# Altium PCB Thunderscope_Rev5.3.PcbDoc (part 6 of 14)
Units mil, origin at the board's own origin, x right, y up, seen from the top; angles counter-clockwise.
Board outline 3937.01 x 3838.58 mil, 6 copper layers (F.Cu, In1.Cu (GND), In2.Cu (Sign), In3.Cu (Sign), In4.Cu (GND), B.Cu), stack 60.556 mil thick; 911 components, 486 nets, 2834 pads, 2761 vias.
Unrouted connection lines stored in the file: 618.
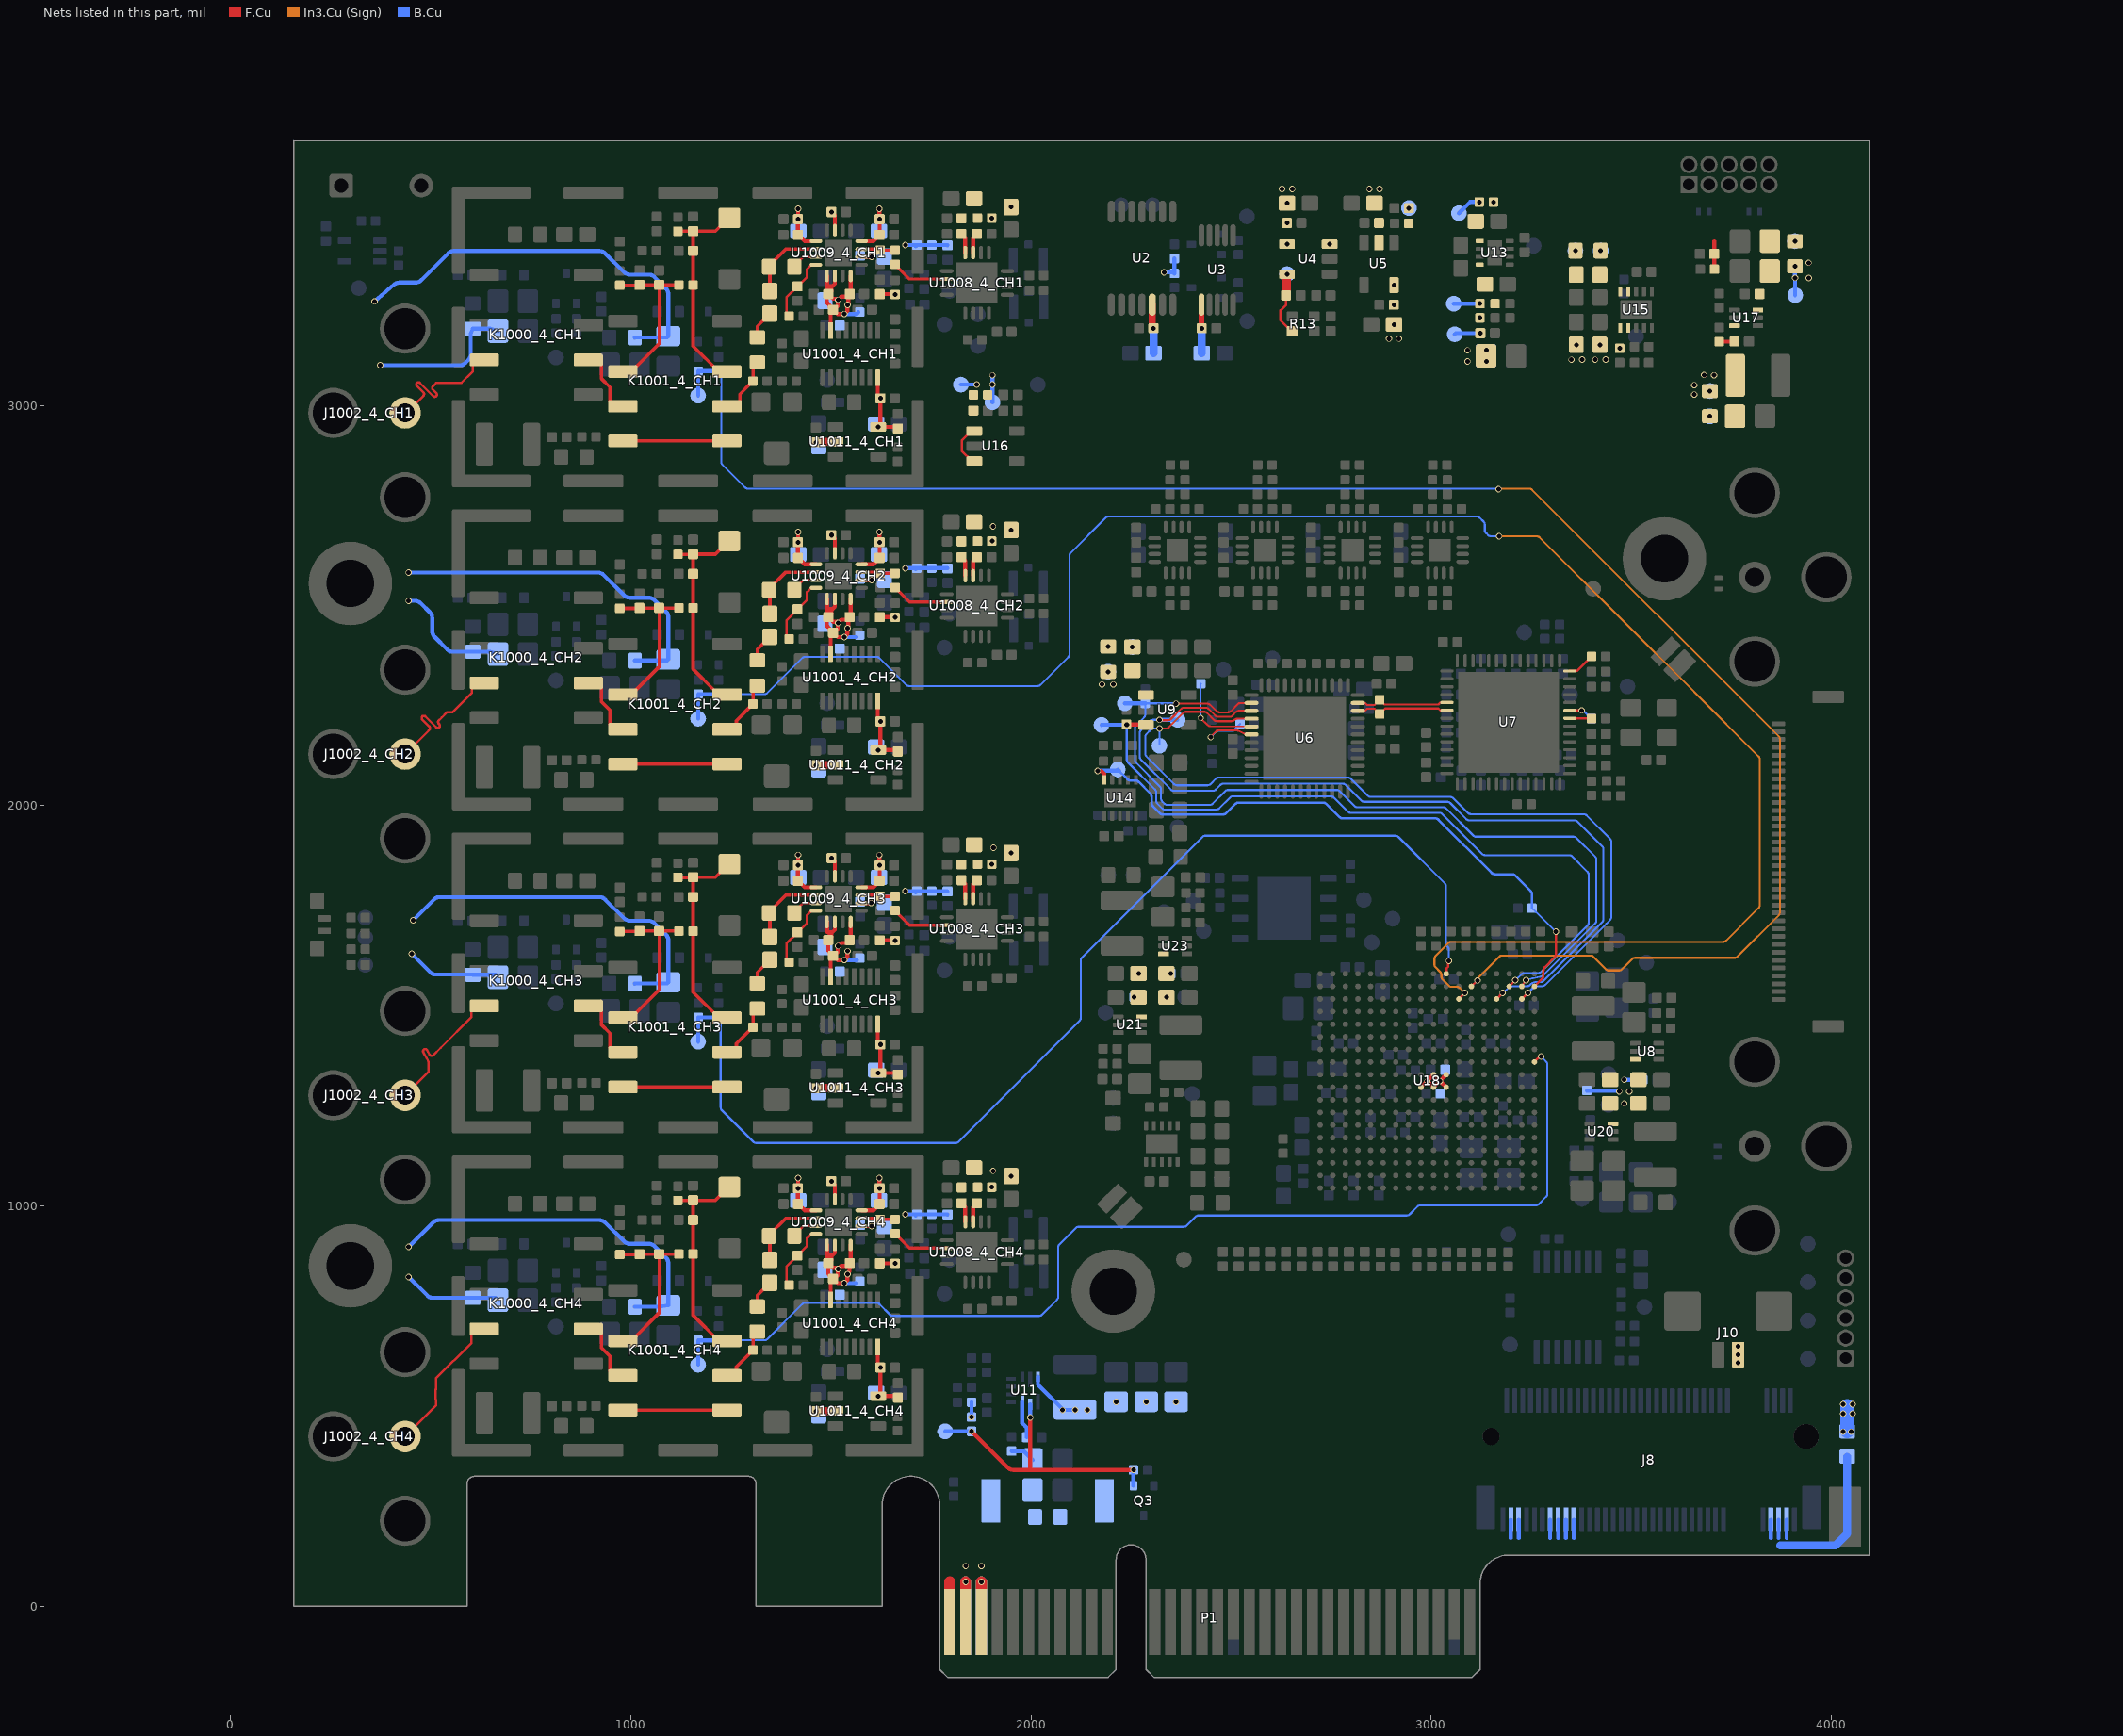
[diagram p9: the nets of this part, all layers, seen from the top]

## Via types
v1: diameter 16, hole 11.81, F.Cu to B.Cu, tented both sides, 2761 vias

## Nets (pads, with @x,y where several pads share a name; then routed paths per layer and width w, separated by ;. In a path a pad name is that pad's centre, name@x,y a point inside that pad or via, vN(x,y) a via of type N, cw(c..) or ccw(c..) an arc to the next point about the centre after c; other vN are vias at no path point) (continued)
+5V: C2.1 C3.1 C5.1 C8.1 C85.2 C94.2 C95.2 C96.2 C121.2 C122.2 C1004_4_CH1.2 C1004_4_CH2.2 C1004_4_CH3.2 C1004_4_CH4.2 C1006_4_CH1.2 C1006_4_CH2.2 C1006_4_CH3.2 C1006_4_CH4.2 C1008_4_CH1.2 C1008_4_CH2.2 C1008_4_CH3.2 C1008_4_CH4.2 C1040_4_CH1.2 C1040_4_CH2.2 C1040_4_CH3.2 C1040_4_CH4.2 C1044_4_CH1.1 C1044_4_CH2.1 C1044_4_CH3.1 C1044_4_CH4.1 C1045_4_CH1.1 C1045_4_CH2.1 C1045_4_CH3.1 C1045_4_CH4.1 C1046_4_CH1.1 C1046_4_CH2.1 C1046_4_CH3.1 C1046_4_CH4.1 C1047_4_CH1.1 C1047_4_CH2.1 C1047_4_CH3.1 C1047_4_CH4.1 C1048_4_CH1.1 C1048_4_CH2.1 C1048_4_CH3.1 C1048_4_CH4.1 C1049_4_CH1.1 C1049_4_CH2.1 C1049_4_CH3.1 C1049_4_CH4.1 C1050_4_CH1.1 C1050_4_CH2.1 C1050_4_CH3.1 C1050_4_CH4.1 FB1000_4_CH1.2 FB1000_4_CH2.2 FB1000_4_CH3.2 FB1000_4_CH4.2 R11.2 R12.2 R100.2 R106.1 TP35.1 TP40.1 U2.12 U3.1 U4.3 U4.4 U5.5 U15.1 U15.2 U1001_4_CH1.16 U1001_4_CH2.16 U1001_4_CH3.16 U1001_4_CH4.16 U1009_4_CH1.1 U1009_4_CH1.12 U1009_4_CH1.15 U1009_4_CH2.1 U1009_4_CH2.12 U1009_4_CH2.15 U1009_4_CH3.1 U1009_4_CH3.12 U1009_4_CH3.15 U1009_4_CH4.1 U1009_4_CH4.12 U1009_4_CH4.15 U1011_4_CH1.5 U1011_4_CH2.5 U1011_4_CH3.5 U1011_4_CH4.5 | length 2209.6
  F.Cu w9.84: v1(1417.72,1044.29) 1418.01,1044.59 1418.01,1069.59 v1(1418.31,1069.88) ; v1(1418.31,1876.97) 1418.31,1853.02 1418.46,1852.87 v1(1418.46,1851.38) ; v1(1418.31,2684.06) 1418.31,2660.11 1418.46,2659.96 v1(1418.46,2658.46) ; v1(1418.31,3491.14) 1418.31,3467.2 1418.46,3467.04 v1(1418.46,3465.55) ; U1009_4_CH4.12@1576.77,989.17 1597.05,989.17 ; U1009_4_CH3.12@1576.77,1796.26 1597.05,1796.26 ; U1009_4_CH2.12@1576.77,2603.35 1597.05,2603.35 ; U1009_4_CH1.12@1576.77,3410.43 1597.05,3410.43 ; C1046_4_CH4.1@1621.06,1045.94 v1(1621.06,1069.88) ; C1046_4_CH3.1@1621.06,1853.03 v1(1621.06,1876.97) ; C1046_4_CH2.1@1621.06,2660.11 v1(1621.06,2684.06) ; C1046_4_CH1.1@1621.06,3467.2 v1(1621.06,3491.14)
  F.Cu w10: C1044_4_CH3.1@1417.01,1851.38 v1(1418.46,1851.38) ; C1044_4_CH2.1@1417.01,2658.46 v1(1418.46,2658.46) ; C1044_4_CH1.1@1417.01,3465.55 v1(1418.46,3465.55) ; v1(1417.72,1044.29) C1047_4_CH4.1@1417.72,1004.92 1418.7,1004.92 1434.45,989.17 U1009_4_CH4.1@1462.6,989.17 ; C1044_4_CH3.1@1417.72,1851.38 C1047_4_CH3.1@1417.72,1812.01 1418.7,1812.01 1434.45,1796.26 U1009_4_CH3.1@1462.6,1796.26 ; C1044_4_CH2.1@1417.72,2658.46 C1047_4_CH2.1@1417.72,2619.09 1418.7,2619.09 1434.45,2603.35 U1009_4_CH2.1@1462.6,2603.35 ; C1044_4_CH1.1@1417.72,3465.55 C1047_4_CH1.1@1417.72,3426.18 1418.7,3426.18 1434.45,3410.43 U1009_4_CH1.1@1462.6,3410.43 ; v1(1501.38,1062.01) 1509.84,1053.54 U1009_4_CH4.15@1509.84,1016.73 ; v1(1501.38,1869.09) 1509.84,1860.63 U1009_4_CH3.15@1509.84,1823.82 ; v1(1501.38,2676.18) 1509.84,2667.72 U1009_4_CH2.15@1509.84,2630.91 ; v1(1501.38,3483.27) 1509.84,3474.8 U1009_4_CH1.15@1509.84,3437.99 ; 1597.05,989.17 1605.91,989.17 C1049_4_CH4.1@1621.65,1004.92 v1(1621.65,1044.29) 1621.65,1043.59 C1046_4_CH4.1@1621.37,1043.31 ; 1597.05,1796.26 1605.91,1796.26 C1049_4_CH3.1@1621.65,1812.01 v1(1621.65,1851.38) 1621.65,1850.67 C1046_4_CH3.1@1621.37,1850.39 ; 1597.05,2603.35 1605.91,2603.35 C1049_4_CH2.1@1621.65,2619.09 v1(1621.65,2658.46) 1621.65,2657.76 C1046_4_CH2.1@1621.37,2657.48 ; 1597.05,3410.43 1605.91,3410.43 C1049_4_CH1.1@1621.65,3426.18 v1(1621.65,3465.55) 1621.65,3464.85 C1046_4_CH1.1@1621.37,3464.57 ; U1001_4_CH4.16@1617.13,647.64 1617.13,602.95 v1(1623.62,596.46) 1623.62,530.61 v1(1618.11,525.1) 1663.48,525.1 C1045_4_CH4.1@1667.32,521.26 ; U1001_4_CH3.16@1617.13,1454.72 1617.13,1410.04 v1(1623.62,1403.54) 1623.62,1337.7 v1(1618.11,1332.19) 1663.48,1332.19 C1045_4_CH3.1@1667.32,1328.35 ; U1001_4_CH2.16@1617.13,2261.81 1617.13,2217.13 v1(1623.62,2210.63) 1623.62,2144.78 v1(1618.11,2139.27) 1663.48,2139.27 C1045_4_CH2.1@1667.32,2135.43 ; U1001_4_CH1.16@1617.13,3068.9 1617.13,3024.21 v1(1623.62,3017.72) 1623.62,2951.87 v1(1618.11,2946.36) 1663.48,2946.36 C1045_4_CH1.1@1667.32,2942.52 ; R106.1@1891.73,3026.57 R106.1@1891.73,3026.77 ; C3.1@2425.98,3193.5 v1(2426.58,3192.91) ; C5.1@2639.37,3456.1 v1(2639.76,3455.71) ; C8.1@2906.59,3251.57 v1(2906.79,3251.38)
  F.Cu w13.78: C3.1@2425.98,3193.5 U3.1@2425.98,3251.97
  F.Cu w17.72: C2.1@2302.95,3198.23 U2.12@2302.95,3251.97
  B.Cu w10: TP40.1@1903.54,3007.8 v1(1903.54,3075.39) ; v1(2332.34,3332.34) 2355.96,3332.34 R12.2@2356.3,3332.68 ; R12.2@2358.27,3329.73 R11.2@2358.27,3367.13
  B.Cu w20: C96.2@2305.91,3130.71 v1(2305.91,3192.91) ; C95.2@2426.57,3130.71 v1(2426.58,3192.91)
  other v1: 1901.58,1046.85 1950,1074.61 1905,1088 1901.58,1853.94 1950,1881.69 1906,1895 1903.58,2661.02 1950,2688.78 1905,2698 1903.54,3052.17 3350.39,3114.17 3376.97,3114.57 3409.45,3114.17 3436.02,3114.57 3470.67,3142.72 3362.4,3151.57 3421.46,3151.57 2894,3166.93 2919.59,3166.93 2906.79,3202.36 2906.79,3300.79 2639.76,3402.95 2746.06,3402.95 1901.58,3468.11 1950,3495.87 2639.76,3505.32 2626.97,3540.75 2652.56,3540.75
+5V3: C100.2 C101.2 C102.1 C128.2 R71.2 R90.1 R98.1 R109.2 TP37.1 TP72.1 U17.6 | length 78.1
  F.Cu w10: R109.2@3703.74,3340.35 3707.48,3344.09 3707.48,3410.43
  B.Cu w10: v1(3908.86,3410.43) 3909.57,3409.72 TP72.1@3915.08,3409.72
  other v1: 3423.42,3386.81 3155.51,3508.27
+5V3_R_CP: C111.2 R90.2 TP28.1 U13.1 | length 62.6
  B.Cu w10: TP28.1@3069.02,3480.43 3096.85,3508.27 v1(3120.08,3508.27)
+5V3_R_LDO: C119.2 C120.2 R98.2 TP34.1 U15.9 U15.10
  other v1: 3360.43,3386.81
+5V_R_PGA: C125.1 R106.2 TP38.1 U16.1 U16.3 | length 148.3
  F.Cu w6: U16.3@1858.27,2861.22 1852.17,2861.22 1826.77,2886.61 1826.77,2912.2 1850.59,2936.02 U16.1@1858.27,2936.02
  B.Cu w10: TP38.1@1824.8,3052.17 v1(1864.17,3052.17)
+12V_PCIe: P1.A2 P1.A3 P1.B1 P1.B2 P1.B3 R42.1 TP14.1 | length 502
  F.Cu w27.56: P1.B1@1797.24,-39.37 1797.24,61.02 ; P1.B2@1836.61,-39.37 v1(1836.61,61.02) ; P1.B3@1875.98,-39.37 v1(1875.98,61.02)
  B.Cu w27.56: P1.A2@1836.61,-39.37 v1(1836.61,61.02) ; P1.A3@1875.98,-39.37 v1(1875.98,61.02)
  other v1: 1836.61,100.39 1875.98,100.39
+12V_PCIe_R: C12.2 C80.2 C81.2 R42.2 R87.2 TP15.1 U11.6 | length 155.6
  B.Cu w10: R87.2@1951.77,387.79 1981.3,387.79 C12.2@2003.94,365.16 ; U11.6@1978.09,511.44 1978.09,457.28 1989.76,445.6 C81.2@1989.76,422.24
+VBIAS: C6.1 C1033_4_CH1.2 C1033_4_CH2.2 C1033_4_CH3.2 C1033_4_CH4.2 R13.2 R1045_4_CH1.1 R1045_4_CH2.1 R1045_4_CH3.1 R1045_4_CH4.1 R1046_4_CH1.1 R1046_4_CH2.1 R1046_4_CH3.1 R1046_4_CH4.1 TP8.1 U4.5 | length 615.9
  F.Cu w6: C6.1@2637.2,3274.8 C6.1@2637.4,3275 2637.4,3251.18 2623.62,3237.4 2623.62,3212.7 2650.69,3185.63 R13.2@2652.36,3185.63
  F.Cu w10: U4.5@2637.4,3325.79 v1(2639.76,3328.15)
  F.Cu w23.62: C6.1@2637.4,3275 U4.5@2637.4,3325.79
  B.Cu w10: v1(1686.02,979.33) R1045_4_CH4.1@1714.57,979.33 ; v1(1686.02,1786.42) R1045_4_CH3.1@1714.57,1786.42 ; v1(1686.02,2593.5) R1045_4_CH2.1@1714.57,2593.5 ; v1(1686.02,3400.59) R1045_4_CH1.1@1714.57,3400.59 ; R1045_4_CH4.1@1711.61,976.38 R1045_4_CH4.1@1714.57,979.33 ; R1045_4_CH3.1@1711.61,1783.46 R1045_4_CH3.1@1714.57,1786.42 ; R1045_4_CH2.1@1711.61,2590.55 R1045_4_CH2.1@1714.57,2593.5 ; R1045_4_CH1.1@1711.61,3397.64 R1045_4_CH1.1@1714.57,3400.59 ; C1033_4_CH4.2@1791.34,978.74 1790.75,979.33 R1046_4_CH4.1@1751.97,979.33 R1045_4_CH4.1@1714.57,979.33 ; C1033_4_CH3.2@1791.34,1785.83 1790.75,1786.42 R1046_4_CH3.1@1751.97,1786.42 R1045_4_CH3.1@1714.57,1786.42 ; C1033_4_CH2.2@1791.34,2592.91 1790.75,2593.5 R1046_4_CH2.1@1751.97,2593.5 R1045_4_CH2.1@1714.57,2593.5 ; C1033_4_CH1.2@1791.34,3400 1790.75,3400.59 R1046_4_CH1.1@1751.97,3400.59 R1045_4_CH1.1@1714.57,3400.59 ; TP8.1@2637.4,3314.57 2637.4,3325.79 v1(2639.76,3328.15)
+VPGA_CH1: C1036_4_CH1.1 C1037_4_CH1.1 C1038_4_CH1.1 C1039_4_CH1.2 FB1000_4_CH1.1 U1008_4_CH1.3 U1008_4_CH1.4 | length 102.3
  F.Cu w9.84: C1038_4_CH1.1@1826.18,3467.52 C1038_4_CH1.1@1826.97,3468.31 ; FB1000_4_CH1.1@1865.55,3467.52 FB1000_4_CH1.1@1866.14,3468.11
  F.Cu w10: C1036_4_CH1.1@1826.18,3428.15 1835.55,3418.78 1835.55,3381.97 U1008_4_CH1.4@1835.63,3381.89 ; U1008_4_CH1.3@1855.31,3381.89 1855.39,3381.97 1855.39,3418.78 C1037_4_CH1.1@1864.76,3428.15
+VPGA_CH2: C1036_4_CH2.1 C1037_4_CH2.1 C1038_4_CH2.1 C1039_4_CH2.2 FB1000_4_CH2.1 U1008_4_CH2.3 U1008_4_CH2.4 | length 102.3
  F.Cu w9.84: C1038_4_CH2.1@1826.18,2660.43 C1038_4_CH2.1@1826.97,2661.22 ; FB1000_4_CH2.1@1865.55,2660.43 FB1000_4_CH2.1@1866.14,2661.02
  F.Cu w10: C1036_4_CH2.1@1826.18,2621.06 1835.55,2611.69 1835.55,2574.88 U1008_4_CH2.4@1835.63,2574.8 ; U1008_4_CH2.3@1855.31,2574.8 1855.39,2574.88 1855.39,2611.69 C1037_4_CH2.1@1864.76,2621.06
+VPGA_CH3: C1036_4_CH3.1 C1037_4_CH3.1 C1038_4_CH3.1 C1039_4_CH3.2 FB1000_4_CH3.1 U1008_4_CH3.3 U1008_4_CH3.4 | length 102.3
  F.Cu w9.84: C1038_4_CH3.1@1826.18,1853.35 C1038_4_CH3.1@1826.97,1854.13 ; FB1000_4_CH3.1@1865.55,1853.35 FB1000_4_CH3.1@1866.14,1853.94
  F.Cu w10: C1036_4_CH3.1@1826.18,1813.98 1835.55,1804.61 1835.55,1767.8 U1008_4_CH3.4@1835.63,1767.72 ; U1008_4_CH3.3@1855.31,1767.72 1855.39,1767.8 1855.39,1804.61 C1037_4_CH3.1@1864.76,1813.98
+VPGA_CH4: C1036_4_CH4.1 C1037_4_CH4.1 C1038_4_CH4.1 C1039_4_CH4.2 FB1000_4_CH4.1 U1008_4_CH4.3 U1008_4_CH4.4 | length 102.3
  F.Cu w9.84: C1038_4_CH4.1@1826.18,1046.26 C1038_4_CH4.1@1826.97,1047.05 ; FB1000_4_CH4.1@1865.55,1046.26 FB1000_4_CH4.1@1866.14,1046.85
  F.Cu w10: C1036_4_CH4.1@1826.18,1006.89 1835.55,997.52 1835.55,960.71 U1008_4_CH4.4@1835.63,960.63 ; U1008_4_CH4.3@1855.31,960.63 1855.39,960.71 1855.39,997.52 C1037_4_CH4.1@1864.76,1006.89
+VUSB: C9.2 C10.2 C22.2 C71.2 C72.2 C73.2 C83.2 C84.2 C175.2 C179.2 C187.2 C1026_4_CH1.2 C1026_4_CH2.2 C1026_4_CH3.2 C1026_4_CH4.2 C1028_4_CH1.2 C1028_4_CH2.2 C1028_4_CH3.2 C1028_4_CH4.2 J10.1 L6.2 R1.2 R14.1 R54.2 R71.1 R73.2 R89.1 R92.1 R117.2 R121.2 R128.2 R1027_4_CH1.1 R1027_4_CH2.1 R1027_4_CH3.1 R1027_4_CH4.1 R1028_4_CH1.1 R1028_4_CH2.1 R1028_4_CH3.1 R1028_4_CH4.1 TP21.1 TP30.1 TP71.1 U8.3 U11.3 U20.3 U21.3 U23.3 | length 5291.7
  B.Cu w10: v1(360,3260) 408.52,3302.15 cw(c421.63,3287.05) 421.63,3307.05 462.15,3307.05 ccw(c462.15,3327.05) 476.26,3312.88 543.39,3380 cw(c557.5,3365.83) 557.5,3385.83 921.52,3385.83 cw(c921.52,3365.83) 935.61,3380.02 983.4,3332.55 ccw(c997.46,3346.77) 997.46,3326.77 1044.87,3326.77 cw(c1044.87,3306.77) 1058.99,3320.93 1087.86,3292.06 cw(c1073.7,3277.94) 1093.7,3277.94 1093.7,3192.42 C1028_4_CH1.2@1093.7,3173.23 1090.69,3170.22 1009.98,3170.22 R1028_4_CH1.1@1009.45,3169.69 ; v1(374.02,3100.39) 572.42,3100.39 ccw(c572.42,3120.39) 586.53,3106.22 594.17,3113.86 ccw(c580,3127.97) 600,3127.97 600,3179.02 R1027_4_CH1.1@605.12,3191.73 648.92,3191.73 C1026_4_CH1.2@668.11,3185.83 ; v1(444.88,822.83) 491.39,776.33 491.42,776.29 ccw(c505.53,790.47) 505.53,770.47 R1027_4_CH4.1@605.12,770.47 C1026_4_CH4.2@662.2,770.47 ; v1(444.88,897.64) 506.31,959.07 cw(c520.46,944.93) 520.46,964.93 921.15,964.93 cw(c921.15,944.93) 935.25,959.12 983.42,911.26 ccw(c997.46,925.51) 997.46,905.51 1044.87,905.51 cw(c1044.87,885.51) 1059.01,899.65 1087.84,870.82 cw(c1073.7,856.68) 1093.7,856.68 1093.7,771.16 C1028_4_CH4.2@1093.7,751.97 1070.57,748.43 R1028_4_CH4.1@1009.45,748.43 ; v1(444.88,2511.81) 461.04,2511.81 cw(c461.04,2491.81) 475.15,2505.98 497.96,2483.17 cw(c483.82,2469.03) 503.82,2469.03 503.82,2435.93 ccw(c523.82,2436.02) 509.62,2421.93 541.07,2390.48 ccw(c555.19,2404.65) 555.19,2384.65 648.92,2384.65 C1026_4_CH2.2@668.11,2378.74 ; v1(444.88,2582.68) 917.9,2582.68 cw(c917.9,2562.68) 932.03,2576.83 ; v1(452.76,1629.92) 498.74,1583.94 ccw(c512.81,1598.15) 512.81,1578.15 590.43,1578.15 R1027_4_CH3.1@605.12,1577.56 C1026_4_CH3.2@662.2,1577.56 ; v1(456.26,1713.73) 508.26,1765.74 cw(c522.41,1751.6) 522.41,1771.6 921.57,1771.6 cw(c921.57,1751.6) 935.67,1765.79 983.4,1718.38 ccw(c997.46,1732.6) 997.46,1712.6 1044.87,1712.6 cw(c1044.87,1692.6) 1058.99,1706.76 1087.86,1677.88 cw(c1073.7,1663.76) 1093.7,1663.76 1093.7,1578.25 C1028_4_CH3.2@1093.7,1559.06 1090.69,1556.04 1009.98,1556.04 R1028_4_CH3.1@1009.45,1555.51 ; 932.04,2576.82 983.38,2525.48 ccw(c997.46,2539.68) 997.46,2519.68 1044.87,2519.68 cw(c1044.87,2499.68) 1058.98,2513.86 1087.88,2484.96 cw(c1073.7,2470.85) 1093.7,2470.85 1093.7,2385.33 C1028_4_CH2.2@1093.7,2366.14 1090.69,2363.13 1009.98,2363.13 R1028_4_CH2.1@1009.45,2362.6 ; v1(1851.38,472.44) R73.2@1851.38,509.84 ; U11.3@2017.45,573.46 2017.53,573.38 2017.53,553.64 2080.67,490.5 v1(2110,490.5) ; R117.2@3388.78,1288.39 3466.98,1288.39 v1(3469.49,1285.88) ; v1(3482.28,1315.4) R1.2@3527.76,1315.4 ; v1(3908.86,3347.44) v1(3908.86,3318.83) 3909.15,3318.54 3909.15,3275.89 TP71.1@3909.45,3275.59
  B.Cu w35: R54.2@4039.37,437.01 4039.37,500.63
  other v1: 4029,436 4049,436 4029,481 4053,481 2079,490 2141,490 4029,505 4053,505 2212.77,510.83 2287.57,510.83 2362.38,510.83 3766.61,608 3766.61,628.57 3766.61,649 3482.28,1256.35 3495.08,1285.88 2257.87,1521.65 2338.58,1521.65 2268.7,1580.71 2349.41,1580.71 2177.17,2303.15 2205.71,2303.15 2192.91,2334.65 3656.89,3027.17 3696.26,3036.02 3656.89,3050.79 3706.49,3075.51 3681.5,3076.4 3943.06,3318.69 3942.91,3356.5
+VUSB_M2: J8.3 J8.5 J8.13 J8.15 J8.17 J8.19 J8.69 J8.71 J8.73 R54.1 | length 788.7
  B.Cu w10: 3198.82,170.28 J8.3@3198.82,216.54 ; 3218.5,170.28 J8.5@3218.5,216.54 ; 3297.24,170.28 J8.13@3297.24,216.54 ; 3316.93,170.28 J8.15@3316.93,216.54 ; 3336.61,170.28 J8.17@3336.61,216.54 ; 3356.3,170.28 J8.19@3356.3,216.54 ; 3848.43,170.28 J8.69@3848.43,216.54 ; 3868.11,170.28 J8.71@3868.11,216.54 ; 3887.8,170.28 J8.73@3887.8,216.54
  B.Cu w20: 3872,152 4010.27,152 4039.37,181.1 R54.1@4039.37,374.02
+VUSB_PG: Q3.2 R92.2 R108.1 TP86.1 U11.5 | length 714.4
  F.Cu w10: v1(1851.38,437.01) 1942.59,345.8 ccw(c1955.29,358.55) 1955.29,340.55 1995,340.55 ; v1(1998,472) 1998,343.55 1995,340.55 ; v1(2255.91,340.55) 1995,340.55
  B.Cu w10: TP86.1@1785.43,437.01 v1(1851.38,437.01) ; U11.5@1997.76,504.55 1997.84,504.47 1997.84,472.16 v1(1998,472) ; Q3.2@2255.91,301.18 v1(2255.91,340.55)
+VUSB_R: C99.2 C127.1 L1.1 R14.2 R72.2 TP22.1 U17.3 | length 38.4
  F.Cu w10: R72.2@3719.49,3159.45 3757.09,3159.45 C127.1@3757.68,3160.04
  other v1: 3696.26,2973.03
+VUSB_R_ACQ: C107.2 C108.2 R89.2 TP26.1 U9.1 | length 0
  other v1: 2252.95,2396.65 2192.91,2397.64
-5V: C11.2 C93.1 C97.2 C98.2 C103.1 C1003_4_CH1.1 C1003_4_CH2.1 C1003_4_CH3.1 C1003_4_CH4.1 C1005_4_CH1.1 C1005_4_CH2.1 C1005_4_CH3.1 C1005_4_CH4.1 C1007_4_CH1.1 C1007_4_CH2.1 C1007_4_CH3.1 C1007_4_CH4.1 C1052_4_CH1.2 C1052_4_CH2.2 C1052_4_CH3.2 C1052_4_CH4.2 C1053_4_CH1.2 C1053_4_CH2.2 C1053_4_CH3.2 C1053_4_CH4.2 C1054_4_CH1.2 C1054_4_CH2.2 C1054_4_CH3.2 C1054_4_CH4.2 C1055_4_CH1.2 C1055_4_CH2.2 C1055_4_CH3.2 C1055_4_CH4.2 C1056_4_CH1.2 C1056_4_CH2.2 C1056_4_CH3.2 C1056_4_CH4.2 C1057_4_CH1.2 C1057_4_CH2.2 C1057_4_CH3.2 C1057_4_CH4.2 R91.2 R1036_4_CH1.2 R1036_4_CH2.2 R1036_4_CH3.2 R1036_4_CH4.2 TP31.1 U5.2 U1001_4_CH1.7 U1001_4_CH2.7 U1001_4_CH3.7 U1001_4_CH4.7 U1009_4_CH1.5 U1009_4_CH1.6 U1009_4_CH1.8 U1009_4_CH1.10 U1009_4_CH2.5 U1009_4_CH2.6 U1009_4_CH2.8 U1009_4_CH2.10 U1009_4_CH3.5 U1009_4_CH3.6 U1009_4_CH3.8 U1009_4_CH3.10 U1009_4_CH4.5 U1009_4_CH4.6 U1009_4_CH4.8 U1009_4_CH4.10 U1011_4_CH1.2 U1011_4_CH2.2 U1011_4_CH3.2 U1011_4_CH4.2 | length 2225.1
  F.Cu w5: C1052_4_CH4.2@1499.41,858.27 C1052_4_CH4.2@1499.41,860.32 ; C1052_4_CH3.2@1499.41,1665.35 C1052_4_CH3.2@1499.41,1667.41 ; C1052_4_CH2.2@1499.41,2472.44 C1052_4_CH2.2@1499.41,2474.5 ; C1052_4_CH1.2@1499.41,3279.53 C1052_4_CH1.2@1499.41,3281.58
  F.Cu w9.84: U1009_4_CH4.10@1576.77,949.8 v1(1601.38,949.8) ; U1009_4_CH3.10@1576.77,1756.89 v1(1600.3,1756.89) ; U1009_4_CH2.10@1576.77,2563.98 v1(1601.38,2563.98) ; U1009_4_CH1.10@1576.77,3371.06 v1(1601.38,3371.06)
  F.Cu w10: v1(1462.6,486.81) C1053_4_CH4.2@1463.48,487.7 ; C1053_4_CH3.2@1462.6,1293.9 v1(1463.04,1294.34) ; v1(1462.6,2100.98) C1053_4_CH2.2@1463.48,2101.87 ; v1(1462.6,2908.07) C1053_4_CH1.2@1463.48,2908.96 ; C1052_4_CH4.2@1490.16,866.59 1490.16,876.97 ; U1009_4_CH4.5@1490.16,902.56 1490.16,876.97 ; U1009_4_CH3.5@1490.16,1709.65 1490.16,1684.06 1503.88,1684.06 ; U1009_4_CH2.5@1490.16,2516.73 1490.16,2491.14 ; U1009_4_CH1.5@1490.16,3323.82 1490.16,3298.23 ; C1052_4_CH4.2@1495.96,854.82 1505.31,845.47 1514.76,845.47 v1(1517.72,842.52) ; U1001_4_CH4.7@1499.02,765.75 1499.02,808.66 C1055_4_CH4.2@1507.28,816.93 ; U1001_4_CH3.7@1499.02,1572.83 1499.02,1615.75 C1055_4_CH3.2@1507.28,1624.02 ; U1001_4_CH2.7@1499.02,2379.92 1499.02,2422.83 C1055_4_CH2.2@1507.28,2431.1 ; U1001_4_CH1.7@1499.02,3187.01 1499.02,3229.92 C1055_4_CH1.2@1507.28,3238.19 ; C1052_4_CH4.2@1500.98,864.17 1500.98,874.07 1503.88,876.97 1490.16,876.97 ; C1052_4_CH3.2@1500.98,1671.26 1500.98,1681.16 ; C1052_4_CH2.2@1500.98,2478.35 1500.98,2488.24 1503.88,2491.14 1490.16,2491.14 ; C1052_4_CH1.2@1500.98,3285.43 1500.98,3295.33 1503.88,3298.23 1490.16,3298.23 ; C1055_4_CH4.2@1505.31,817.91 1493.23,830 1493.23,857.01 C1052_4_CH4.2@1493.5,857.28 1493.5,866.59 1503.91,877 1509.84,882.93 U1009_4_CH4.6@1509.84,902.56 ; C1055_4_CH3.2@1505.31,1625 1493.23,1637.08 1493.23,1664.1 C1052_4_CH3.2@1493.5,1664.37 1493.5,1673.68 1503.91,1684.08 1509.84,1690.02 U1009_4_CH3.6@1509.84,1709.65 ; C1055_4_CH2.2@1505.31,2432.09 1497.72,2439.69 1497.72,2441.47 1489.17,2450.01 1489.17,2467.13 C1052_4_CH2.2@1493.5,2471.46 ; C1055_4_CH1.2@1505.31,3239.17 1497.72,3246.77 1497.72,3249.11 1489.17,3257.66 1489.17,3274.21 C1052_4_CH1.2@1493.5,3278.54 ; U1009_4_CH2.6@1509.84,2516.73 1509.84,2497.1 1503.91,2491.17 1493.5,2480.76 C1052_4_CH2.2@1493.5,2471.46 ; U1009_4_CH1.6@1509.84,3323.82 1509.84,3304.19 1503.91,3298.26 1493.5,3287.85 C1052_4_CH1.2@1493.5,3278.54 ; v1(1533.31,1614.32) 1525.8,1614.18 cw(c1525.41,1634.17) 1525.41,1614.17 1517.13,1614.17 C1055_4_CH3.2@1507.28,1624.02 ; v1@1533.46,1614.17 1541.34,1622.05 v1(1541.34,1636.81) ; C1056_4_CH1.2@1547.19,3278.2 1543.47,3274.48 1543.47,3254.74 1541.34,3252.61 1541.34,3236.22 v1(1533.46,3228.35) 1517.13,3228.35 C1055_4_CH1.2@1507.28,3238.19 ; C1056_4_CH2.2@1547.52,2470.79 1543.47,2466.73 1543.47,2447.65 1541.34,2445.52 1541.34,2429.13 v1(1533.46,2421.26) 1517.13,2421.26 C1055_4_CH2.2@1507.28,2431.1 ; U1009_4_CH4.8@1549.21,902.56 1549.21,859.65 C1056_4_CH4.2@1546.85,857.28 ; U1009_4_CH3.8@1549.21,1709.65 1549.21,1666.73 C1056_4_CH3.2@1546.85,1664.37 1539.96,1657.48 1525.59,1657.48 v1(1517.72,1649.61) 1516.73,1648.62 1516.73,1633.46 C1055_4_CH3.2@1507.28,1624.02 ; U1009_4_CH2.8@1549.21,2516.73 1549.21,2473.82 C1056_4_CH2.2@1546.85,2471.46 1539.96,2464.57 1525.59,2464.57 v1(1517.72,2456.69) ; U1009_4_CH1.8@1549.21,3323.82 1549.21,3280.91 C1056_4_CH1.2@1546.85,3278.54 1539.96,3271.65 1525.59,3271.65 v1(1517.72,3263.78) ; C11.2@2868.21,3457.28 C11.2@2869.39,3456.1 ; 1490.16,2491.14 1490.16,2474.8 C1052_4_CH2.2@1493.5,2471.46 ; 1490.16,3298.23 1490.16,3281.89 C1052_4_CH1.2@1493.5,3278.54 ; C1052_4_CH2.2@1493.5,2471.46 1505.31,2459.65 1514.76,2459.65 v1(1517.72,2456.69) ; C1052_4_CH1.2@1493.5,3278.54 1505.31,3266.73 1514.76,3266.73 v1(1517.72,3263.78) ; C1055_4_CH4.2@1507.28,816.93 1516.73,826.38 1516.73,841.54 v1(1517.72,842.52) ; C1055_4_CH4.2@1507.28,816.93 1517.13,807.09 v1(1533.46,807.09) 1541.34,814.96 v1(1541.34,829.72) ccw(c1528.03,843.03) 1546.85,843.03 C1056_4_CH4.2@1546.85,857.28 ; C1055_4_CH2.2@1507.28,2431.1 1516.73,2440.55 1516.73,2455.71 v1(1517.72,2456.69) ; C1055_4_CH1.2@1507.28,3238.19 1516.73,3247.64 1516.73,3262.8 v1(1517.72,3263.78) ; v1(1517.72,842.52) 1525.59,850.39 1539.96,850.39 C1056_4_CH4.2@1546.85,857.28
  F.Cu w20: C1053_4_CH4.2@1463.48,487.7 U1011_4_CH4.2@1511.81,487.7 ; C1053_4_CH3.2@1463.48,1294.78 U1011_4_CH3.2@1511.81,1294.78 ; C1053_4_CH2.2@1463.48,2101.87 U1011_4_CH2.2@1511.81,2101.87 ; C1053_4_CH1.2@1463.48,2908.96 U1011_4_CH1.2@1511.81,2908.96
  B.Cu w9.84: C1054_4_CH1.2@1568.9,3374.41 C1054_4_CH1.2@1572.24,3371.06
  B.Cu w10: v1(1533.31,1614.32) 1565.04,1614.32 R1036_4_CH3.2@1563.98,1614.17 ; v1(1533.46,807.09) R1036_4_CH4.2@1563.98,807.09 ; v1(1533.46,2421.26) R1036_4_CH2.2@1563.98,2421.26 ; v1(1533.46,3228.35) 1563.98,3228.35 R1036_4_CH1.2@1568.9,3233.27 ; TP31.1@3058.66,3177.95 3061.42,3180.71 v1(3122.83,3180.71)
  other v1: 1541.34,2443.9 3090.55,3110.24 3137.8,3110.24 3090.55,3137.8 3137.8,3137.8 3122.05,3218.9 1541.34,3250.98 2845.37,3540.75 2870.97,3540.75
-5V_R: C106.2 R91.1 R93.2 TP29.1 U13.4 | length 65.7
  B.Cu w10: TP29.1@3056.3,3254.33 v1(3122.05,3254.33)
-VBIAS: C82.2 C1032_4_CH1.2 C1032_4_CH2.2 C1032_4_CH3.2 C1032_4_CH4.2 R107.1 R1042_4_CH1.1 R1042_4_CH2.1 R1042_4_CH3.1 R1042_4_CH4.1 TP9.1 | length 154.9
  F.Cu w10: C1032_4_CH4.2@1622.05,856.89 1659.84,856.89 v1(1660.43,856.3) ; C1032_4_CH3.2@1622.05,1663.98 1659.84,1663.98 v1(1660.43,1663.39) ; C1032_4_CH2.2@1622.05,2471.06 1659.84,2471.06 R1042_4_CH2.1@1660.43,2470.47 v1(1660.14,2470.77) ; C1032_4_CH1.2@1622.05,3278.15 1659.84,3278.15 v1(1660.43,3277.56)
  other v1: 2944.19,3493.11
AC0: R50.2 U7.23 | length 64.7
  F.Cu w6: U7.23@3346.46,2238.19 v1@3377.95,2238.19
  B.Cu w6: v1(3375.98,2238.19) 3378.94,2238.19 3399.61,2217.52 R50.2@3400.59,2217.52
AC1: R51.2 U7.22 | length 54.5
  F.Cu w6: U7.22@3346.46,2218.5 3399.61,2218.5 R51.2@3400.59,2217.52
AC2: R52.2 U7.28 | length 69.2
  F.Cu w6: U7.28@3346.46,2336.61 3364.17,2336.61 R52.2@3400.59,2373.03
ACQ_EN: R94.1 TP1.1 U9.3 U18.T17 | length 1906.9
  F.Cu w6: U18.T17@3195.07,1548.64 3210.04,1563.61 v1(3210.04,1564.43)
  F.Cu w10: R94.1@2238.19,2203.74 R94.1@2240.16,2201.77 ; v1(2239.17,2202.76) 2286.42,2202.76 U9.3@2287.4,2201.77
  B.Cu w5: v1@2238.19,2201.77 v1(2239.17,2202.76) ccw(c2249.12,2201.77) 2239.13,2201.66 2239.17,2197.56 cw(c2229.17,2197.44) 2239.17,2197.44 2239.17,2115.36 ccw(c2249.17,2115.36) 2242.09,2108.31 2310.08,2040.31 cw(c2302.99,2033.26) 2312.99,2033.26 2312.99,2012.02 ccw(c2322.99,2012.02) 2315.9,2004.96 2327.79,1993.07 ccw(c2334.85,2000.16) 2334.85,1990.16 2462.79,1990.16 ccw(c2462.79,2000.16) 2469.84,1993.07 2497.5,2020.72 cw(c2504.54,2013.62) 2504.54,2023.62 2749.4,2023.62 cw(c2749.4,2013.62) 2756.46,2020.71 2791.97,1985.2 ccw(c2799.02,1992.28) 2799.02,1982.28 3020.46,1982.28 cw(c3020.46,1972.28) 3027.52,1979.37 3127.34,1879.55 ccw(c3134.39,1886.64) 3134.39,1876.64 3344.54,1876.64 cw(c3344.54,1866.64) 3351.6,1873.73 3390.58,1834.74 cw(c3383.49,1827.69) 3393.49,1827.69 3393.49,1707.94 cw(c3383.49,1707.94) 3390.58,1700.89 3274.52,1584.83 cw(c3267.46,1591.92) 3267.46,1581.92 3232.76,1581.92 ccw(c3232.76,1571.92) 3225.95,1579.24 v1(3210.04,1564.43)
  B.Cu w10: TP1.1@2176.18,2201.77 cw(c2180.59,2182.26) 2180.59,2202.26 2234.83,2202.26 ccw(c2234.76,2222.26) v1(2239.17,2202.76)
ACQ_PG: R59.2 TP24.1 U14.5 U18.V17 | length 1591.6
  F.Cu w6: U18.V17@3257.93,1548.59 3276.88,1567.53 ccw(c3268.37,1576) 3280.37,1576 3280.37,1587.62 cw(c3292.37,1587.62) 3283.86,1596.09 3308,1620.22 ccw(c3299.49,1628.68) 3311.49,1628.68 v1(3311.49,1685.83)
  F.Cu w10: v1(2166.34,2086.61) 2176.18,2086.61 2183.07,2079.72 U14.5@2183.07,2062.01
  B.Cu w5: R59.2@3251.97,1744.09 3260.83,1735.24 3307.99,1688.07 ccw(c3315.02,1695.19) v1(3311.49,1685.83) ; TP24.1@2216.54,2090.55 2220.47,2086.61 TP24.1@2216.54,2090.55
  B.Cu w6: TP24.1@2220.47,2086.61 TP24.1@2216.54,2090.55 2240.6,2066.48 ccw(c2249.06,2074.99) 2249.06,2062.99 2260.78,2062.99 cw(c2260.78,2050.99) 2269.24,2059.5 2297.69,2031.05 cw(c2289.18,2022.59) 2301.18,2022.59 2301.18,2006.94 ccw(c2313.18,2006.94) 2304.66,1998.49 2321.33,1981.82 ccw(c2329.77,1990.35) 2329.77,1978.35 2479.28,1978.35 ccw(c2479.28,1990.35) 2487.74,1981.84 2510.3,2004.4 cw(c2518.75,1995.87) 2518.75,2007.87 2729.67,2007.87 cw(c2729.67,1995.87) 2738.14,2004.38 2770.55,1971.97 ccw(c2778.99,1980.5) 2778.99,1968.5 3009.77,1968.5 cw(c3009.77,1956.5) 3018.23,1965.01 3150.76,1832.49 ccw(c3159.22,1840.99) 3159.22,1828.99 3201.47,1828.99 cw(c3201.47,1816.99) 3209.93,1825.5 3248.48,1786.96 cw(c3239.97,1778.49) 3251.97,1778.49 3251.97,1752.91 R59.2@3251.97,1744.09
  B.Cu w10: v1(2166.34,2086.61) cw(c2173.02,2067.76) 2173.02,2087.76 2196.4,2087.76 cw(c2196.4,2067.76) 2197.26,2087.74 2204.95,2087.41 ccw(c2205.75,2107.39) 2206.38,2087.4 2215.86,2087.7 ccw(c2215.55,2097.7) 2218.83,2088.25 TP24.1@2216.54,2090.55 TP24.1@2220.47,2086.61
ADC_CLK_N: R22.1 U6.34 U7.48 | length 237.6
  F.Cu w5: U6.34@2816.66,2237.2 2834.37,2237.2 2839.15,2241.98 2845.38,2241.98 2858.69,2241.98 R22.1@2871.35,2229.33 2884.98,2242.97 3017.86,2242.97 3022.64,2238.19 U7.48@3039.37,2238.19
ADC_CLK_P: R22.2 U6.35 U7.47 | length 236.7
  F.Cu w5: U6.35@2816.66,2256.89 2834.37,2256.89 2839.15,2252.11 2845.38,2252.11 2858.69,2252.11 R22.2@2871.35,2264.76 2883.01,2253.1 3017.86,2253.1 3022.64,2257.87 U7.47@3039.37,2257.87
ADC_CSn: R15.2 TP10.1 U6.2 U18.U17 | length 2198.5
  F.Cu w5: v1(2362.2,2254.92) 2440.74,2254.92 cw(c2440.74,2244.92) 2447.81,2251.99 2463.64,2236.16 ccw(c2470.68,2243.27) 2470.68,2233.27 2491.92,2233.27 ccw(c2491.92,2243.27) 2498.99,2236.2 2516.77,2253.98 cw(c2523.83,2246.89) 2523.83,2256.89 U6.2@2550.91,2256.89
  F.Cu w6: U18.U17@3226.57,1548.64 U18.U17@3226.38,1548.72 v1(3236.95,1564.47)
  B.Cu w5: v1(2362.2,2254.92) ccw(c2357.88,2245.91) 2357.93,2255.91 2294.29,2255.91 R15.2@2285.43,2255.91 2285.43,2227.57 cw(c2275.43,2227.57) 2282.52,2220.51 2262.4,2200.39 ccw(c2269.49,2193.34) 2259.49,2193.34 2259.49,2114.73 ccw(c2269.49,2114.73) 2262.38,2107.7 2321.87,2048.2 cw(c2314.8,2041.13) 2324.8,2041.13 2324.8,2017.53 ccw(c2334.8,2017.53) 2327.7,2010.49 2333.31,2004.88 ccw(c2340.36,2011.97) 2340.36,2001.97 2446.65,2001.97 ccw(c2446.65,2011.97) 2453.7,2004.88 2485.29,2036.47 cw(c2492.33,2029.37) 2492.33,2039.37 2763.97,2039.37 cw(c2763.97,2029.37) 2771.01,2036.47 2808.5,1998.98 ccw(c2815.56,2006.06) 2815.56,1996.06 3030.31,1996.06 cw(c3030.31,1986.06) 3037.36,1993.16 3104.91,1925.6 ccw(c3111.96,1932.69) 3111.96,1922.69 3355.65,1922.69 cw(c3355.65,1912.69) 3362.7,1919.78 3409.59,1872.89 cw(c3402.5,1865.84) 3412.5,1865.84 3412.5,1712.76 cw(c3402.5,1712.76) 3409.59,1705.7 3283.7,1579.82 ; v1(3236.95,1564.47) 3252.75,1568.71 cw(c3257.93,1549.39) 3254.19,1569.04 3271.2,1572.27 ccw(c3267.46,1591.92) 3280.79,1577 3281.31,1577.47 ccw(c3274.65,1584.93) 3281.7,1577.83 3283.68,1579.79
  B.Cu w10: TP10.1@2234.25,2255.91 2278.62,2255.91 R15.2@2285.43,2255.91
ADC_PD: R17.1 U6.6 | length 198.6
  F.Cu w5: v1(2448.82,2171.26) cw(c2457.99,2167.27) 2450.91,2174.33 2461.44,2184.87 cw(c2468.5,2177.78) 2468.5,2187.78 2514.77,2187.78 cw(c2514.77,2177.78) 2518.91,2186.88 2538.11,2178.15 U6.6@2550.91,2178.15
  B.Cu w5: v1(2448.82,2171.26) 2465.23,2187.67 2505.57,2187.67 R17.1@2522.64,2204.74
ADC_RSTn: R16.2 U6.5 | length 221.3
  F.Cu w5: v1(2423.8,2219.34) ccw(c2432.37,2224.49) 2425.27,2217.45 2440.98,2201.73 ccw(c2448.04,2208.82) 2447.91,2198.82 U6.5@2550.91,2197.83
  B.Cu w5: v1(2423.8,2219.34) 2423.8,2304.7 R16.2@2424.21,2305.12
ADC_SCLK: TP12.1 U6.4 U18.U16 | length 2154.4
  F.Cu w5: v1(2320.87,2192.72) 2337.2,2192.72 ccw(c2337.2,2202.72) 2344.26,2195.64 2380.57,2231.94 cw(c2387.61,2224.84) 2387.61,2234.84 2432.3,2234.84 cw(c2432.3,2224.84) 2439.35,2231.94 2457.34,2214.07 ccw(c2464.36,2221.19) 2464.36,2211.19 2501.07,2211.19 ccw(c2501.07,2221.19) 2508.12,2214.1 2508.64,2214.62 cw(c2515.68,2207.52) 2515.68,2217.52 U6.4@2550.91,2217.52
  F.Cu w6: U18.U16@3226.57,1517.14 3240.39,1530.97 3241,1530.97 3241.39,1531.36 v1(3241.39,1532.15)
  B.Cu w5: TP12.1@2320.87,2152.56 v1(2320.87,2192.72) 2306.95,2192.72 ccw(c2306.95,2180.72) 2298.5,2189.25 2288.92,2179.67 ccw(c2297.43,2171.21) 2285.43,2171.21 2285.43,2130.95 ccw(c2297.43,2130.95) 2288.93,2122.49 2356.75,2054.67 ccw(c2365.21,2063.18) 2365.21,2051.18 2440.9,2051.18 ccw(c2440.9,2063.18) 2449.36,2054.67 2462.07,2067.39 cw(c2470.52,2058.87) 2470.52,2070.87 2790.4,2070.87 cw(c2790.4,2058.87) 2798.86,2067.38 2840.53,2025.71 ccw(c2849.02,2034.2) 2848.97,2022.2 3046.4,2022.19 cw(c3046.4,2010.19) 3054.88,2018.68 3091.03,1982.53 ccw(c3099.46,1991.07) 3099.4,1979.07 3380.05,1979.07 cw(c3380.05,1967.07) 3388.51,1975.58 3446.75,1917.34 cw(c3438.24,1908.88) 3450.24,1908.88 3450.24,1722.93 cw(c3438.24,1722.93) 3446.75,1714.47 3437.3,1705.01 3284.44,1552.16 3284.19,1551.94 cw(c3276.2,1560.89) 3276.2,1548.89 3263.1,1548.89 ccw(c3263.1,1536.89) 3254.66,1545.41 v1(3241.39,1532.15)
ADC_SDATA: TP11.1 U6.3 U18.R16 | length 2217.1
  F.Cu w5: v1(2320.87,2214.57) ccw(c2325.19,2223.58) 2325.19,2213.58 2342.31,2213.58 ccw(c2342.31,2223.58) 2349.37,2216.5 2374.86,2241.98 cw(c2381.9,2234.88) 2381.9,2244.88 2436.58,2244.88 cw(c2436.58,2234.88) 2443.64,2241.97 2460.48,2225.12 ccw(c2467.52,2232.23) 2467.52,2222.23 2496.49,2222.23 ccw(c2496.49,2232.23) 2503.55,2225.14 2512.71,2234.31 cw(c2519.75,2227.2) 2519.75,2237.2 U6.3@2550.91,2237.2
  F.Cu w6: U18.R16@3163.58,1517.14 v1(3178.55,1532.12)
  B.Cu w5: v1(2320.87,2214.57) 2304.34,2214.57 ccw(c2304.34,2204.57) 2297.29,2211.66 2274.55,2188.92 ccw(c2281.62,2181.85) 2271.62,2181.85 2271.62,2122.28 ccw(c2281.62,2122.28) 2274.52,2115.24 2349.45,2040.31 ccw(c2356.5,2047.4) 2356.5,2037.4 2454.52,2037.4 ccw(c2454.52,2047.4) 2461.57,2040.31 2473.48,2052.22 cw(c2480.52,2045.12) 2480.52,2055.12 2778.93,2055.12 cw(c2778.93,2045.12) 2785.98,2052.21 2825.43,2012.76 ccw(c2832.49,2019.84) 2832.49,2009.84 3040.15,2009.84 cw(c3040.15,1999.84) 3047.22,2006.91 3087.85,1966.29 ccw(c3094.9,1973.37) 3094.9,1963.37 3358.27,1963.37 cw(c3358.27,1953.37) 3365.33,1960.46 3427.16,1898.63 cw(c3420.07,1891.57) 3430.07,1891.57 3430.07,1716.13 cw(c3420.07,1716.13) 3427.16,1709.07 3280.39,1562.3 cw(c3273.33,1569.39) 3273.33,1559.39 3263.1,1559.39 ccw(c3263.1,1536.89) 3247.25,1552.85 3246.24,1551.84 cw(c3239.19,1558.93) 3239.19,1548.93 3201.94,1548.93 ccw(c3201.94,1538.93) 3195.44,1546.54 v1(3178.55,1532.12)
  B.Cu w10: v1(2320.87,2214.57) TP11.1@2365.16,2214.57
AGND: C167.2 FB11.1 U18.J9 U18.K9 U18.K10 U18.L9 U18.L10 | length 155.4
  F.Cu w10: U18.J9@2974.47,1296.62 v1@2989.72,1311.87 ; U18.K10@3005.83,1328.06 U18.K10@3005.96,1328.11 ; v1@3021.22,1311.87 3005.96,1296.62 2990.71,1311.87 v1(2990.21,1311.87) 2990.21,1312.36 U18.K10@3005.96,1328.11 ; U18.L10@3037.32,1328.06 3037.46,1328.11 v1@3021.71,1312.36 ; U18.L9@3037.46,1296.62 3022.2,1311.87 v1(3021.71,1311.87) v1@3021.71,1312.36 ; U18.K10@3005.96,1328.11 v1@3021.71,1312.36
ATTEN_1: R1030_4_CH1.2 R1032_4_CH1.1 TP1015_4_CH1.1 U18.N17 | length 4589.3
  F.Cu w6: U18.N17@3100.59,1548.64 v1(3115.56,1563.61)
  In3.Cu (Sign) w5: v1(3115.56,1563.61) 3115.56,1564.15 cw(c3125.56,1564.15) 3118.48,1571.22 3170.2,1622.94 cw(c3177.26,1615.85) 3177.26,1625.85 3397.99,1625.85 cw(c3397.99,1615.85) 3405.04,1622.94 3436.76,1591.22 ccw(c3443.79,1598.33) 3443.79,1588.33 3469.08,1588.33 ccw(c3469.08,1598.33) 3476.14,1591.24 3502.07,1617.18 cw(c3509.11,1610.08) 3509.11,1620.08 3757.81,1620.08 ccw(c3757.81,1630.08) 3764.87,1622.99 3868.18,1726.3 ccw(c3861.09,1733.36) 3871.09,1733.36 3871.09,2166.19 ccw(c3861.09,2166.19) 3868.18,2173.25 3252.02,2789.41 ccw(c3244.96,2782.32) 3244.96,2792.32 3172.64,2792.32 ccw(c3172.68,2782.32) v1(3168.15,2791.24)
  B.Cu w5: R1030_4_CH1.2@1219.49,3085.63 1225.98,3076.77 1225.98,2858.87 ccw(c1235.98,2858.87) 1228.9,2851.81 1285.5,2795.21 ccw(c1292.53,2802.32) 1292.53,2792.32 3163.66,2792.32 cw(c3163.62,2782.32) v1(3168.15,2791.24)
  B.Cu w10: TP1015_4_CH1.1@1168.31,3024.61 cw(c1188.31,3024.78) 1168.31,3024.78 R1032_4_CH1.1@1168.31,3085.63 1175.12,3085.63 R1030_4_CH1.2@1219.49,3085.63
ATTEN_1X_CH1: K1001_4_CH1.4 K1001_4_CH1.5 | length 259.8
  F.Cu w8.39: K1001_4_CH1.4@980.31,2911.42 K1001_4_CH1.5@1240.16,2911.42
ATTEN_1X_CH2: K1001_4_CH2.4 K1001_4_CH2.5 | length 259.8
  F.Cu w8.39: K1001_4_CH2.4@980.31,2104.33 K1001_4_CH2.5@1240.16,2104.33
ATTEN_1X_CH3: K1001_4_CH3.4 K1001_4_CH3.5 | length 259.8
  F.Cu w8.39: K1001_4_CH3.4@980.31,1297.24 K1001_4_CH3.5@1240.16,1297.24
ATTEN_1X_CH4: K1001_4_CH4.4 K1001_4_CH4.5 | length 259.8
  F.Cu w8.39: K1001_4_CH4.4@980.31,490.16 K1001_4_CH4.5@1240.16,490.16
ATTEN_2: R1030_4_CH2.2 R1032_4_CH2.1 TP1015_4_CH2.1 U18.M16 | length 4752.4
  F.Cu w6: U18.M16@3069.09,1517.14 v1(3084.06,1532.12)
  In3.Cu (Sign) w5: v1(3084.06,1532.12) 3071.45,1544.73 ccw(c3064.38,1537.65) 3064.38,1547.65 3050.9,1547.65 cw(c3050.9,1557.65) 3043.84,1550.57 3028.52,1565.89 cw(c3035.61,1572.94) 3025.61,1572.94 3025.61,1577.31 ccw(c3015.61,1577.31) 3022.68,1584.38 3010.8,1596.25 cw(c3017.91,1603.29) 3007.91,1603.29 3007.91,1617.62 cw(c3017.91,1617.62) 3010.82,1624.68 3043.28,1657.14 cw(c3050.32,1650.04) 3050.32,1660.04 3729.36,1660.04 ccw(c3729.36,1670.04) 3736.41,1662.95 3818.13,1744.67 ccw(c3811.05,1751.72) 3821.05,1751.72 3821.05,2115.83 ; v1(3169.29,2673.23) 3263.64,2673.23 cw(c3263.64,2663.23) 3270.7,2670.32 3477.12,2464.35 ; 3477.14,2464.34 3657.75,2283.73 ; 3657.76,2283.71 3818.12,2122.85 cw(c3811.05,2115.78) 3821.05,2115.87
  B.Cu w5: R1030_4_CH2.2@1219.49,2278.54 1333.46,2278.54 ccw(c1333.46,2288.54) 1340.53,2281.47 1427.8,2368.74 cw(c1434.85,2361.65) 1434.85,2371.65 1614.36,2371.65 cw(c1614.36,2361.65) 1621.43,2368.72 1688.03,2302.13 ccw(c1695.09,2309.21) 1695.09,2299.21 2016.94,2299.21 ccw(c2016.94,2309.21) 2024,2302.13 2093.09,2371.22 ccw(c2086,2378.27) 2096,2378.27 2096,2624.68 cw(c2106,2624.68) 2098.92,2631.74 2186.72,2719.54 cw(c2193.76,2712.44) 2193.76,2722.44 3113.97,2722.44 cw(c3113.97,2712.44) 3121.02,2719.53 3130.95,2709.61 cw(c3123.86,2702.55) 3133.86,2702.55 3133.86,2688.39 ccw(c3143.86,2688.39) 3136.76,2681.35 3141.97,2676.14 ccw(c3149.02,2683.23) 3149.02,2673.23 v1(3169.29,2673.23)
  B.Cu w10: TP1015_4_CH2.1@1168.31,2217.52 cw(c1188.31,2217.7) 1168.31,2217.7 R1032_4_CH2.1@1168.31,2278.54 1175.12,2278.54 R1030_4_CH2.2@1219.49,2278.54
ATTEN_3: R1030_4_CH3.2 R1032_4_CH3.1 TP1015_4_CH3.1 U18.L18 | length 2872.5
  F.Cu w6: U18.L18@3037.46,1580.08 3038.89,1581.51 3038.89,1594.41 3042.3,1597.82 3042.3,1610.93 v1(3044.21,1612.84)
  B.Cu w5: R1030_4_CH3.2@1219.49,1471.46 1224.41,1462.6 1224.41,1246.27 ccw(c1234.41,1246.27) 1227.31,1239.23 1306.17,1160.37 ccw(c1313.2,1167.48) 1313.2,1157.48 1811.8,1157.48 ccw(c1811.8,1167.48) 1818.86,1160.39 2121.47,1463 ccw(c2114.38,1470.06) 2124.38,1470.06 2124.38,1613.71 cw(c2134.38,1613.71) 2127.29,1620.76 2428.83,1922.3 cw(c2435.87,1915.2) 2435.87,1925.2 2910.72,1925.2 cw(c2910.72,1915.2) 2917.78,1922.28 3033.68,1806.38 cw(c3026.59,1799.32) 3036.59,1799.32 3036.59,1656.53 ccw(c3046.59,1656.53) 3039.55,1649.43 3041.28,1647.7 cw(c3034.21,1640.63) 3044.21,1640.63 v1(3044.21,1612.84)
  B.Cu w10: TP1015_4_CH3.1@1168.31,1410.43 cw(c1188.31,1410.61) 1168.31,1410.61 R1032_4_CH3.1@1168.31,1471.46 1175.12,1471.46 R1030_4_CH3.2@1219.49,1471.46
ATTEN_4: R1030_4_CH4.2 R1032_4_CH4.1 TP1015_4_CH4.1 U18.V11 | length 2807
  F.Cu w6: U18.V11@3257.93,1359.61 3257.93,1360.69 3270.73,1373.49 v1(3274.47,1373.49)
  B.Cu w5: R1030_4_CH4.2@1219.49,664.37 1333.46,664.37 ccw(c1333.46,674.37) 1340.51,667.28 1428.2,754.98 cw(c1435.24,747.87) 1435.24,757.87 1613.97,757.87 cw(c1613.97,747.87) 1621.02,754.96 1647.53,728.46 ccw(c1654.56,735.57) 1654.56,725.57 2020.39,725.57 ccw(c2020.39,735.57) 2027.44,728.48 2064.83,765.87 ccw(c2057.75,772.92) 2067.75,772.92 2067.75,896.58 cw(c2077.75,896.58) 2070.66,903.64 2112.12,945.1 cw(c2119.16,938) 2119.16,948 2381.8,948 ccw(c2381.8,958) 2388.85,950.91 2411.26,973.32 cw(c2418.3,966.22) 2418.3,976.22 2938.98,976.22 ccw(c2938.98,986.22) 2946.03,979.13 2965.77,998.87 cw(c2972.81,991.77) 2972.81,1001.77 3261.82,1001.77 ccw(c3261.82,1011.77) 3268.87,1004.68 3287.06,1022.88 ccw(c3279.98,1029.93) 3289.98,1029.93 3289.98,1353.83 ccw(c3279.98,1353.83) 3287.05,1360.9 v1(3274.47,1373.49)
  B.Cu w10: TP1015_4_CH4.1@1168.31,603.35 cw(c1188.31,603.52) 1168.31,603.52 R1032_4_CH4.1@1168.31,664.37 1175.12,664.37 R1030_4_CH4.2@1219.49,664.37
ATTEN_50X_IN_CH1: C1012_4_CH1.2 C1023_4_CH1.2 K1001_4_CH1.2 R1001_4_CH1.2 R1024_4_CH1.1 | length 393.4
  F.Cu w8.39: R1001_4_CH1.2@972.44,3300.2 1020.67,3300.2 C1012_4_CH1.2@1021.65,3301.18 C1023_4_CH1.2@1070.87,3301.18 ; K1001_4_CH1.2@1001.18,3084.65 1070.87,3154.33 C1023_4_CH1.2@1070.87,3301.18 ; R1024_4_CH1.1@1120.08,3301.18 C1023_4_CH1.2@1070.87,3301.18
ATTEN_50X_IN_CH2: C1012_4_CH2.2 C1023_4_CH2.2 K1001_4_CH2.2 R1001_4_CH2.2 R1024_4_CH2.1 | length 393.4
  F.Cu w8.39: R1001_4_CH2.2@972.44,2493.11 1020.67,2493.11 C1012_4_CH2.2@1021.65,2494.09 C1023_4_CH2.2@1070.87,2494.09 ; K1001_4_CH2.2@1001.18,2277.56 1070.87,2347.24 C1023_4_CH2.2@1070.87,2494.09 ; R1024_4_CH2.1@1120.08,2494.09 C1023_4_CH2.2@1070.87,2494.09
ATTEN_50X_IN_CH3: C1012_4_CH3.2 C1023_4_CH3.2 K1001_4_CH3.2 R1001_4_CH3.2 R1024_4_CH3.1 | length 393.4
  F.Cu w8.39: R1001_4_CH3.2@972.44,1686.02 1020.67,1686.02 C1012_4_CH3.2@1021.65,1687.01 C1023_4_CH3.2@1070.87,1687.01 ; K1001_4_CH3.2@1001.18,1470.47 1070.87,1540.16 C1023_4_CH3.2@1070.87,1687.01 ; R1024_4_CH3.1@1120.08,1687.01 C1023_4_CH3.2@1070.87,1687.01
ATTEN_50X_IN_CH4: C1012_4_CH4.2 C1023_4_CH4.2 K1001_4_CH4.2 R1001_4_CH4.2 R1024_4_CH4.1 | length 414.3
  F.Cu w8.39: R1001_4_CH4.2@972.44,878.94 1020.67,878.94 C1012_4_CH4.2@1021.65,879.92 C1023_4_CH4.2@1070.87,879.92 ; K1001_4_CH4.2@980.31,663.39 1001.18,663.39 1070.87,733.07 C1023_4_CH4.2@1070.87,879.92 ; R1024_4_CH4.1@1120.08,879.92 C1023_4_CH4.2@1070.87,879.92
ATTEN_50X_OUT_CH1: C1021_4_CH1.2 C1024_4_CH1.1 C1059_4_CH1.1 K1001_4_CH1.7 R1024_4_CH1.2 R1026_4_CH1.2 | length 532.8
  F.Cu w8.39: R1026_4_CH1.2@1117.32,3435.04 1154.92,3435.04 C1021_4_CH1.2@1155.51,3435.63 ; K1001_4_CH1.7@1232.09,3084.65 1219.29,3084.65 1155.51,3148.42 R1024_4_CH1.2@1155.51,3301.18 C1024_4_CH1.1@1155.51,3386.42 C1021_4_CH1.2@1155.51,3435.63 ; C1059_4_CH1.1@1246.06,3468.5 1244.09,3468.5 1211.22,3435.63 C1021_4_CH1.2@1155.51,3435.63
ATTEN_50X_OUT_CH2: C1021_4_CH2.2 C1024_4_CH2.1 C1059_4_CH2.1 K1001_4_CH2.7 R1024_4_CH2.2 R1026_4_CH2.2 | length 532.8
  F.Cu w8.39: R1026_4_CH2.2@1117.32,2627.95 1154.92,2627.95 C1021_4_CH2.2@1155.51,2628.54 ; K1001_4_CH2.7@1232.09,2277.56 1219.29,2277.56 1207.74,2289.11 1155.51,2341.34 R1024_4_CH2.2@1155.51,2494.09 C1024_4_CH2.1@1155.51,2579.33 C1021_4_CH2.2@1155.51,2628.54 ; C1059_4_CH2.1@1246.06,2661.42 1244.09,2661.42 1211.22,2628.54 C1021_4_CH2.2@1155.51,2628.54
ATTEN_50X_OUT_CH3: C1021_4_CH3.2 C1024_4_CH3.1 C1059_4_CH3.1 K1001_4_CH3.7 R1024_4_CH3.2 R1026_4_CH3.2 | length 532.8
  F.Cu w8.39: R1026_4_CH3.2@1117.32,1820.87 1154.92,1820.87 C1021_4_CH3.2@1155.51,1821.46 ; K1001_4_CH3.7@1232.09,1470.47 1219.29,1470.47 1155.51,1534.25 R1024_4_CH3.2@1155.51,1687.01 C1024_4_CH3.1@1155.51,1772.24 C1021_4_CH3.2@1155.51,1821.46 ; C1059_4_CH3.1@1246.06,1854.33 1244.09,1854.33 1211.22,1821.46 C1021_4_CH3.2@1155.51,1821.46
ATTEN_50X_OUT_CH4: C1021_4_CH4.2 C1024_4_CH4.1 C1059_4_CH4.1 K1001_4_CH4.7 R1024_4_CH4.2 R1026_4_CH4.2 | length 532.8
  F.Cu w8.39: R1026_4_CH4.2@1117.32,1013.78 1154.92,1013.78 C1021_4_CH4.2@1155.51,1014.37 ; K1001_4_CH4.7@1232.09,663.39 1219.29,663.39 1155.51,727.17 R1024_4_CH4.2@1155.51,879.92 C1024_4_CH4.1@1155.51,965.16 C1021_4_CH4.2@1155.51,1014.37 ; C1059_4_CH4.1@1246.06,1047.24 1244.09,1047.24 1211.22,1014.37 C1021_4_CH4.2@1155.51,1014.37
ATTEN_IN_CH1: K1000_4_CH1.6 K1001_4_CH1.3 | length 176.2
  F.Cu w8.39: K1000_4_CH1.6@893.7,3113.94 914.57,3113.94 926.12,3102.38 926.12,3067.75 947.89,3045.98 947.89,3027.7 947.89,3009.59 959.45,2998.04 977.56,2998.04 K1001_4_CH1.3@980.31,2998.03
ATTEN_IN_CH2: K1000_4_CH2.6 K1001_4_CH2.3 | length 176.2
  F.Cu w8.39: K1000_4_CH2.6@893.7,2306.85 914.57,2306.85 926.12,2295.3 926.12,2260.67 947.89,2238.89 947.89,2220.61 947.89,2202.5 959.45,2190.95 977.56,2190.95 K1001_4_CH2.3@980.31,2190.94
ATTEN_IN_CH3: K1000_4_CH3.6 K1001_4_CH3.3 | length 176.2
  F.Cu w8.39: K1000_4_CH3.6@893.7,1499.76 914.57,1499.76 926.12,1488.21 926.12,1453.58 947.89,1431.81 947.89,1413.53 947.89,1395.42 959.45,1383.86 977.56,1383.86 K1001_4_CH3.3@980.31,1383.86
ATTEN_IN_CH4: K1000_4_CH4.6 K1001_4_CH4.3 | length 176.2
  F.Cu w8.39: K1000_4_CH4.6@893.7,692.67 914.57,692.67 926.12,681.12 926.12,646.49 947.89,624.72 947.89,606.44 947.89,588.33 959.45,576.77 977.56,576.77 K1001_4_CH4.3@980.31,576.77
ATTEN_OUT_CH1: K1001_4_CH1.6 R1035_4_CH1.1 R1039_4_CH1.1 | length 160.9
  F.Cu w8.39: K1001_4_CH1.6@1232.09,2998.03 1261.02,2998.03 1272.58,3009.59 1272.58,3028.48 1297.5,3053.41 R1039_4_CH1.1@1305.12,3061.02 1305.12,3096.46 R1035_4_CH1.1@1315.94,3107.28
ATTEN_OUT_CH2: K1001_4_CH2.6 R1035_4_CH2.1 R1039_4_CH2.1 | length 124
  F.Cu w8.39: K1001_4_CH2.6@1263.78,2197.83 1263.78,2212.6 R1039_4_CH2.1@1305.12,2253.94 1305.12,2289.37 R1035_4_CH2.1@1315.94,2300.2
ATTEN_OUT_CH3: K1001_4_CH3.6 R1035_4_CH3.1 R1039_4_CH3.1 | length 124
  F.Cu w8.39: K1001_4_CH3.6@1263.78,1390.75 1263.78,1405.51 R1039_4_CH3.1@1305.12,1446.85 1305.12,1482.28 R1035_4_CH3.1@1315.94,1493.11
ATTEN_OUT_CH4: K1001_4_CH4.6 R1035_4_CH4.1 R1039_4_CH4.1 | length 124
  F.Cu w8.39: K1001_4_CH4.6@1263.78,583.66 1263.78,598.42 R1039_4_CH4.1@1305.12,639.76 1305.12,675.2 R1035_4_CH4.1@1315.94,686.02
ATTEN_OUT_R_CH1: C1030_4_CH1.2 R1035_4_CH1.2 | length 72.1
  F.Cu w8.39: R1035_4_CH1.2@1315.94,3170.28 1315.94,3197.83 C1030_4_CH1.2@1347.44,3229.33
ATTEN_OUT_R_CH2: C1030_4_CH2.2 R1035_4_CH2.2 | length 72.1
  F.Cu w8.39: R1035_4_CH2.2@1315.94,2363.19 1315.94,2390.75 C1030_4_CH2.2@1347.44,2422.24
ATTEN_OUT_R_CH3: C1030_4_CH3.2 R1035_4_CH3.2 | length 72.1
  F.Cu w8.39: R1035_4_CH3.2@1315.94,1556.1 1315.94,1583.66 C1030_4_CH3.2@1347.44,1615.16
ATTEN_OUT_R_CH4: C1030_4_CH4.2 R1035_4_CH4.2 | length 72.1
  F.Cu w8.39: R1035_4_CH4.2@1315.94,749.02 1315.94,776.57 C1030_4_CH4.2@1347.44,808.07
BNC_IN_CH1: J1002_4_CH1.1 K1000_4_CH1.3 | length 331.1
  F.Cu w5.9: J1002_4_CH1.1@436.02,2981.3 438.78,2981.3 464.13,3006.65 481.63,3024.15 ccw(c477.46,3028.33) 481.63,3032.5 465.57,3048.56 cw(c469.42,3052.42) 465.56,3056.27 cw(c469.42,3052.42) 473.27,3056.27 506.24,3023.3 ccw(c510.09,3027.16) 513.95,3023.3 ccw(c510.09,3027.16) 513.95,3031.01 505.39,3039.57 cw(c509.56,3043.74) 505.39,3047.91 513.86,3056.38 535.24,3056.38 576.38,3056.38 604.58,3084.58 604.58,3101.59 K1000_4_CH1.3@606.1,3103.1
BNC_IN_CH2: J1002_4_CH2.1 K1000_4_CH2.3 | length 362.6
  F.Cu w5.9: J1002_4_CH2.1@436.02,2128.94 494.39,2187.3 496.48,2189.39 ccw(c492.3,2193.56) 496.48,2197.73 478.99,2215.22 cw(c482.85,2219.07) 478.99,2222.93 cw(c482.85,2219.07) 486.7,2222.93 513.77,2195.86 ccw(c517.62,2199.71) 521.47,2195.86 ccw(c517.62,2199.71) 521.47,2203.57 520.24,2204.81 cw(c524.41,2208.98) 520.24,2213.15 527.44,2220.35 540.09,2233 554,2233 603,2282 603,2294.13 615.72,2306.85 K1000_4_CH2.3@633.86,2306.85
BNC_IN_CH3: J1002_4_CH3.1 K1000_4_CH3.3 | length 375.1
  F.Cu w5.9: J1002_4_CH3.1@436.02,1276.57 494.82,1335.37 494.82,1348.02 494.82,1357.39 ccw(c485.52,1357.39) 493.67,1361.88 481.53,1383.92 cw(c486.3,1386.55) 483.67,1391.32 cw(c486.3,1386.55) 491.08,1389.18 497.19,1378.08 ccw(c502.35,1380.93) 506.53,1376.76 525.09,1395.32 601.92,1472.15 601.92,1487.04 615.88,1501 K1000_4_CH3.3@645.72,1501
BNC_IN_CH4: J1002_4_CH4.1 K1000_4_CH4.3 | length 377.1
  F.Cu w5.9: J1002_4_CH4.1@436.02,424.21 513,501.19 513,512.83 513,515.78 512.5,515.78 512.5,541.68 513,541.68 513,548.75 513,569.08 601.88,657.96 601.88,679.95 614.6,692.67 K1000_4_CH4.3@648.26,692.67
BUF_IN_AUX_CH1: C1034_4_CH1.2 R1043_4_CH1.1 U1009_4_CH1.4 | length 170.1
  F.Cu w6: R1043_4_CH1.1@1397.64,3222.44 1388.78,3231.3 1388.78,3270.08 C1034_4_CH1.2@1416.34,3297.64 1439.96,3321.26 1439.96,3340.55 1450.79,3351.38 U1009_4_CH1.4@1462.6,3351.38
BUF_IN_AUX_CH2: C1034_4_CH2.2 R1043_4_CH2.1 U1009_4_CH2.4 | length 170.1
  F.Cu w6: R1043_4_CH2.1@1397.64,2415.35 1388.78,2424.21 1388.78,2462.99 C1034_4_CH2.2@1416.34,2490.55 1439.96,2514.17 1439.96,2533.46 1450.79,2544.29 U1009_4_CH2.4@1462.6,2544.29
BUF_IN_AUX_CH3: C1034_4_CH3.2 R1043_4_CH3.1 U1009_4_CH3.4 | length 170.1
  F.Cu w6: R1043_4_CH3.1@1397.64,1608.27 1388.78,1617.13 1388.78,1655.91 C1034_4_CH3.2@1416.34,1683.46 1439.96,1707.09 1439.96,1726.38 1450.79,1737.2 U1009_4_CH3.4@1462.6,1737.2
BUF_IN_AUX_CH4: C1034_4_CH4.2 R1043_4_CH4.1 U1009_4_CH4.4 | length 170.1
  F.Cu w6: R1043_4_CH4.1@1397.64,801.18 1388.78,810.04 1388.78,848.82 C1034_4_CH4.2@1416.34,876.38 1439.96,900 1439.96,919.29 1450.79,930.12 U1009_4_CH4.4@1462.6,930.12
BUF_IN_BIAS_CH1: R1038_4_CH1.1 U1009_4_CH1.3 | length 65.5
  F.Cu w6: R1038_4_CH1.1@1408.46,3346.46 1408.46,3348.43 1431.1,3371.06 U1009_4_CH1.3@1462.6,3371.06
BUF_IN_BIAS_CH2: R1038_4_CH2.1 U1009_4_CH2.3 | length 65.5
  F.Cu w6: R1038_4_CH2.1@1408.46,2539.37 1408.46,2541.34 1431.1,2563.98 U1009_4_CH2.3@1462.6,2563.98
BUF_IN_BIAS_CH3: R1038_4_CH3.1 U1009_4_CH3.3 | length 65.5
  F.Cu w6: R1038_4_CH3.1@1408.46,1732.28 1408.46,1734.25 1431.1,1756.89 U1009_4_CH3.3@1462.6,1756.89
BUF_IN_BIAS_CH4: R1038_4_CH4.1 U1009_4_CH4.3 | length 65.5
  F.Cu w6: R1038_4_CH4.1@1408.46,925.2 1408.46,927.17 1431.1,949.8 U1009_4_CH4.3@1462.6,949.8
BUF_IN_CH1: C1030_4_CH1.1 R1038_4_CH1.2 U1009_4_CH1.2 | length 197.8
  F.Cu w8.39: C1030_4_CH1.1@1347.44,3286.42 1347.44,3344.49 R1038_4_CH1.2@1345.47,3346.46 1345.47,3348.92 1387.3,3390.75 U1009_4_CH1.2@1462.6,3390.75
BUF_IN_CH2: C1030_4_CH2.1 R1038_4_CH2.2 U1009_4_CH2.2 | length 197.8
  F.Cu w8.39: C1030_4_CH2.1@1347.44,2479.33 1347.44,2537.4 R1038_4_CH2.2@1345.47,2539.37 1345.47,2541.83 1387.3,2583.66 U1009_4_CH2.2@1462.6,2583.66
BUF_IN_CH3: C1030_4_CH3.1 R1038_4_CH3.2 U1009_4_CH3.2 | length 197.8
  F.Cu w8.39: C1030_4_CH3.1@1347.44,1672.24 1347.44,1730.31 R1038_4_CH3.2@1345.47,1732.28 1345.47,1734.74 1387.3,1776.57 U1009_4_CH3.2@1462.6,1776.57
BUF_IN_CH4: C1030_4_CH4.1 R1038_4_CH4.2 U1009_4_CH4.2 | length 197.8
  F.Cu w8.39: C1030_4_CH4.1@1347.44,865.16 1347.44,923.23 R1038_4_CH4.2@1345.47,925.2 1345.47,927.66 1387.3,969.49 U1009_4_CH4.2@1462.6,969.49
BUF_OUT_CH1: R1037_4_CH1.1 R1041_4_CH1.1 U1009_4_CH1.11 | length 89.1
  F.Cu w8: U1009_4_CH1.11@1576.77,3390.75 1620.08,3390.75 R1041_4_CH1.1@1623.03,3387.79 R1037_4_CH1.1@1660.43,3387.79
  F.Cu w8.39: U1009_4_CH1.11@1576.77,3390.75 U1009_4_CH1.11@1577.05,3391.03 ; R1041_4_CH1.1@1620.36,3391.03 R1041_4_CH1.1@1623.03,3393.7
BUF_OUT_CH2: R1037_4_CH2.1 R1041_4_CH2.1 U1009_4_CH2.11 | length 89.1
  F.Cu w8: U1009_4_CH2.11@1576.77,2583.66 1620.08,2583.66 R1041_4_CH2.1@1623.03,2580.71 R1037_4_CH2.1@1660.43,2580.71
  F.Cu w8.39: U1009_4_CH2.11@1576.77,2583.66 U1009_4_CH2.11@1577.05,2583.94 ; R1041_4_CH2.1@1620.36,2583.94 R1041_4_CH2.1@1623.03,2586.61
BUF_OUT_CH3: R1037_4_CH3.1 R1041_4_CH3.1 U1009_4_CH3.11 | length 89.1
  F.Cu w8: U1009_4_CH3.11@1576.77,1776.57 1620.08,1776.57 R1041_4_CH3.1@1623.03,1773.62 R1037_4_CH3.1@1660.43,1773.62
  F.Cu w8.39: U1009_4_CH3.11@1576.77,1776.57 U1009_4_CH3.11@1577.05,1776.85 ; R1041_4_CH3.1@1620.36,1776.85 R1041_4_CH3.1@1623.03,1779.53
BUF_OUT_CH4: R1037_4_CH4.1 R1041_4_CH4.1 U1009_4_CH4.11 | length 89.1
  F.Cu w8: U1009_4_CH4.11@1576.77,969.49 1620.08,969.49 R1041_4_CH4.1@1623.03,966.53 R1037_4_CH4.1@1660.43,966.53
  F.Cu w8.39: U1009_4_CH4.11@1576.77,969.49 U1009_4_CH4.11@1577.05,969.77 ; R1041_4_CH4.1@1620.36,969.77 R1041_4_CH4.1@1623.03,972.44
BUF_OUT_R_CH1: R1037_4_CH1.2 U1008_4_CH1.6 | length 144.7
  F.Cu w6: R1037_4_CH1.2@1657.97,3350.89 R1037_4_CH1.2@1658.46,3351.38
  F.Cu w8: R1037_4_CH1.2@1660.43,3352.36 1696.85,3315.94 U1008_4_CH1.6@1789.37,3315.94
BUF_OUT_R_CH2: R1037_4_CH2.2 U1008_4_CH2.6 | length 143.7
  F.Cu w6: R1037_4_CH2.2@1657.97,2543.8 R1037_4_CH2.2@1658.46,2544.29
  F.Cu w8: R1037_4_CH2.2@1660.43,2545.28 1696.85,2508.86
  F.Cu w8.39: 1697.83,2508.86 U1008_4_CH2.6@1789.37,2508.86
BUF_OUT_R_CH3: R1037_4_CH3.2 U1008_4_CH3.6 | length 143.7
  F.Cu w6: R1037_4_CH3.2@1657.97,1736.71 R1037_4_CH3.2@1658.46,1737.2
  F.Cu w8: R1037_4_CH3.2@1660.43,1738.19 1696.85,1701.77
  F.Cu w8.39: 1697.83,1701.77 U1008_4_CH3.6@1789.37,1701.77
BUF_OUT_R_CH4: R1037_4_CH4.2 U1008_4_CH4.6 | length 143.7
  F.Cu w6: R1037_4_CH4.2@1657.97,929.63 R1037_4_CH4.2@1658.46,930.12
  F.Cu w8: R1037_4_CH4.2@1660.43,931.1 1696.85,894.69
  F.Cu w8.39: 1697.83,894.69 U1008_4_CH4.6@1789.37,894.69